# Altium PCB Audio_Meter_V4.5.PcbDoc (part 5 of 5)
Units mil, origin at the board's own origin, x right, y up, seen from the top; angles counter-clockwise.
Board outline 2756.14 x 2519.69 mil, 2 copper layers (Top Layer, Bottom Layer), stack 57.087 mil thick; 109 components, 62 nets, 315 pads, 566 vias.
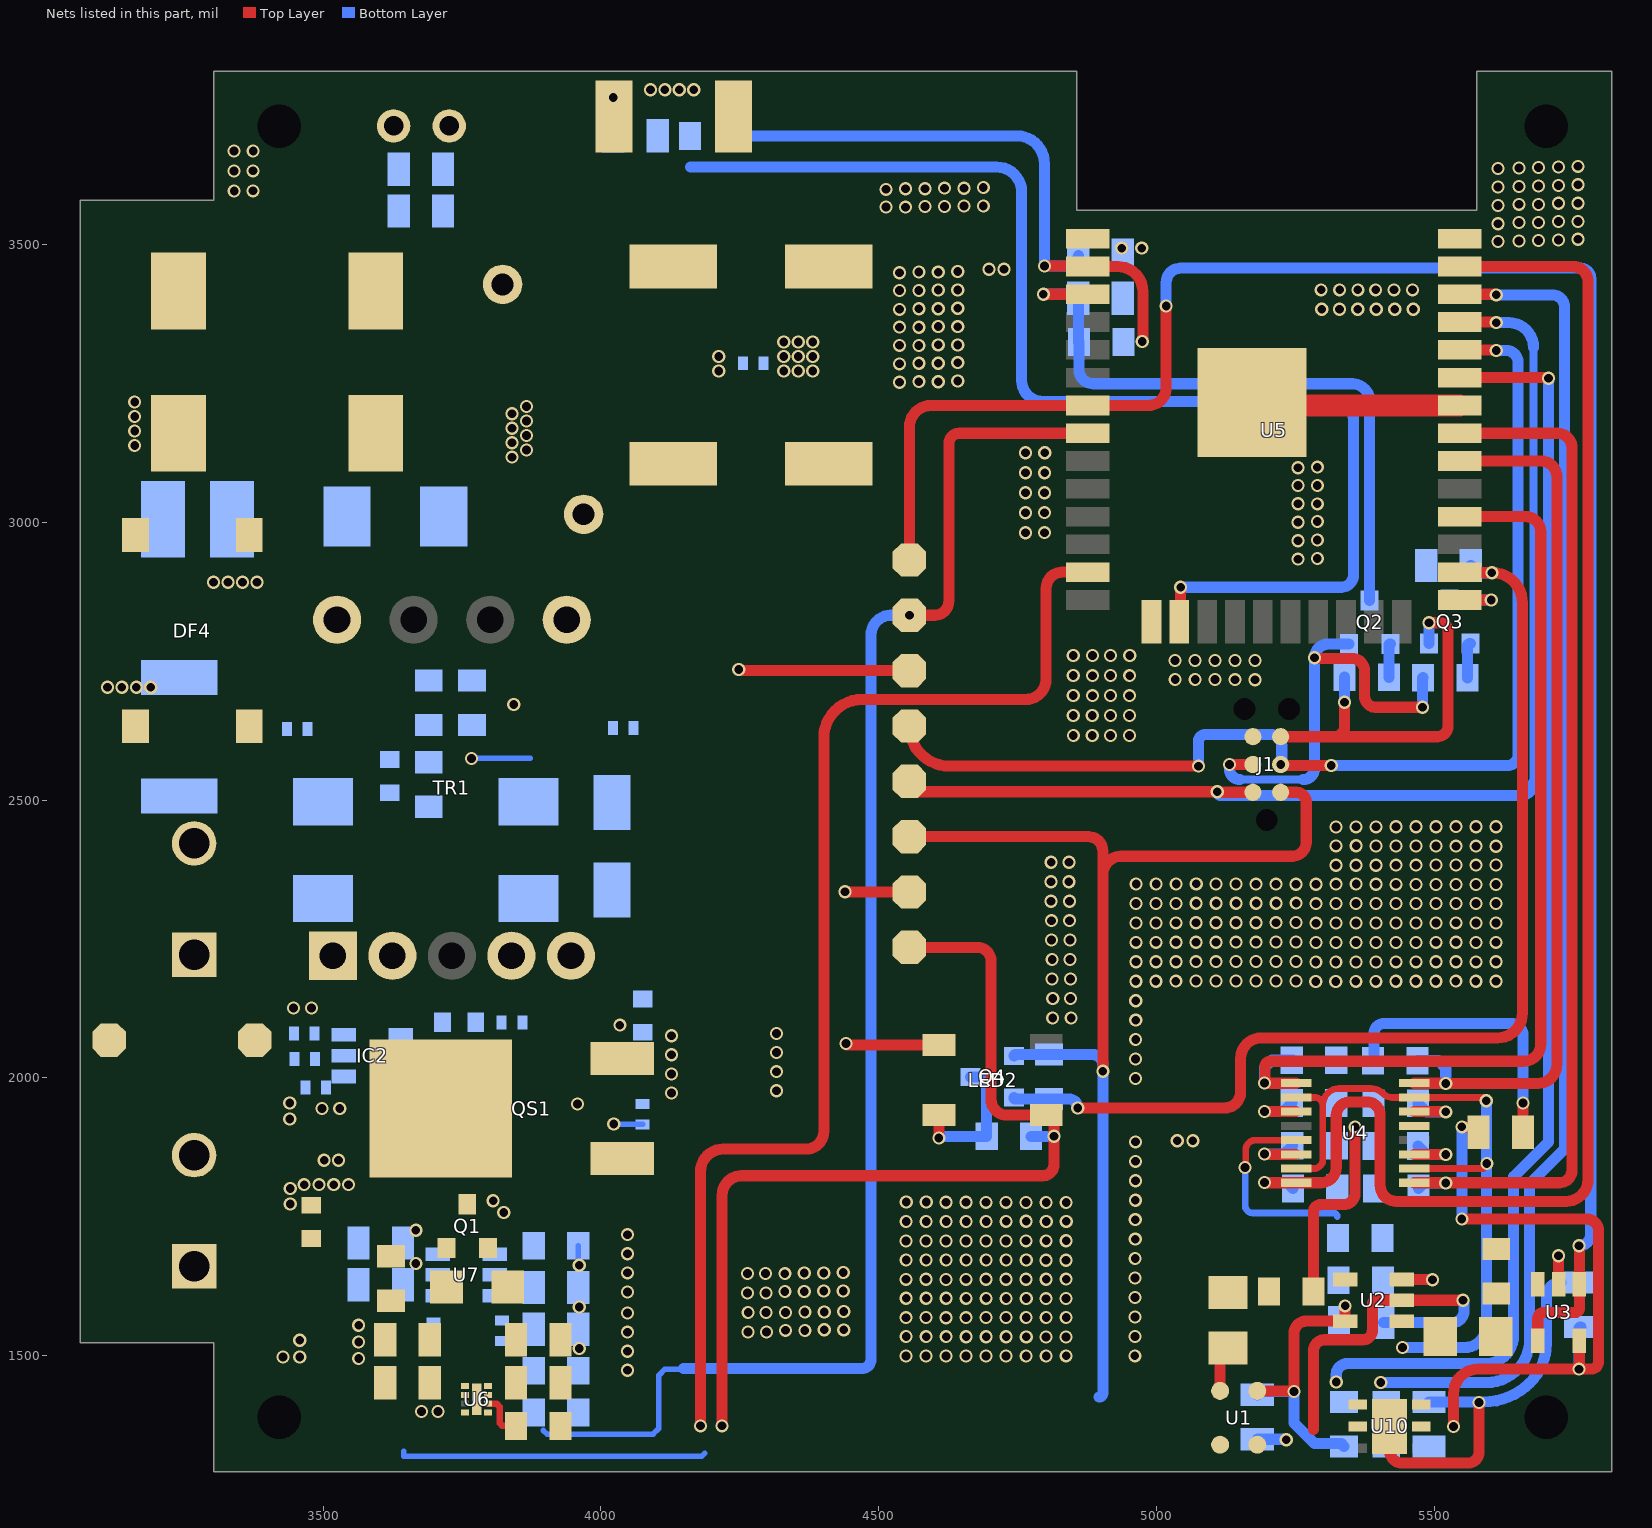
[diagram p2: the nets of this part, all layers, seen from the top]

## Via types
v1: diameter 23.62, hole 15.75, Top Layer to Bottom Layer, 566 vias

## Nets (pads, with @x,y where several pads share a name; then routed paths per layer and width w, separated by ;. In a path a pad name is that pad's centre, name@x,y a point inside that pad or via, vN(x,y) a via of type N, cw(c..) or ccw(c..) an arc to the next point about the centre after c; other vN are vias at no path point)
3V3: C1.1 C2.1 C3.1 C4.1 C7.1 C12.1 C13.1 C22.1 C76.2 J1.1 P4.1 Q4.1 R2.2 R4.2 R5.2 R24.2 R43.2 R56.1 RC1.2 U1.1 U2.5 U3.5 U4.13 U5.2 U6.1 U6.2 U6.4 U10.5 | length 4908
  Top Layer w20: P4.1@4555,2434.14 4876.86,2434.14 cw(c4876.86,2408) 4903,2408 4903,2366 ; v1(4798,3461) 4874.71,3461 cw(c4874.71,3460) U5.2@4875.71,3460 4930,3460 cw(c4930,3415) 4975,3415 4975,3326 cw(c4974,3326) v1(4974,3325) ; v1(4903,2012) 4903,2366 ; U1.1@5181,1437 5246,1437 v1(5247,1436) 5247,1540 cw(c5269.6,1540) 5269.6,1562.6 U2.5@5338.82,1562.6 5338.82,1590 v1(5339,1590) ; J1.1@5223,2514 5251,2514 cw(c5251,2496) 5269,2496 5269,2424 cw(c5244,2424) 5244,2399 4936,2399 ccw(c4936,2366) 4903,2366 ; v1(5534,1373) 5534,1432 cw(c5578,1432) 5578,1476 v1(5760,1476) ccw(c5760,1511) v1@5760.4,1476 ; v1(5549,1746) 5774,1746 cw(c5774,1725) 5795,1725 5795,1489.68 cw(c5781.56,1489.68) 5781.72,1476.25 v1@5760.4,1476 ; v1(5549,1912) 5569,1912 cw(c5569,1902) C2.1@5579,1902 ; U3.5@5760.4,1526.82 v1@5760.4,1476
  Bottom Layer w20: R24.2@4240,3695 4748.34,3695 cw(c4748.34,3645.34) 4798,3645.34 v1(4798,3461) 4840,3461 ccw(c4840,3480) C22.1@4859,3480 ; Q4.1@4743.37,2039.4 cw(c4745.97,2039.4) 4745.97,2042 R56.1@4806,2042 4885,2042 cw(c4885,2024) 4903,2024 v1(4903,2012) 4903,1433 cw(c4896,1433) 4896,1426 ; C1.1@5181,1430 5187,1436 v1(5247,1436) 5247,1379 5284,1342 5332,1342 R4.2@5337,1337 ; v1(5549,1746) v1(5549,1912) ; v1(5760,1476) 5760,1549 cw(c5763,1549) C3.1@5763,1552
  other v1: 3677,1400 3707,1400 4698,3455 4725,3455
#12-P: R8.2 U4.1 U5.28 | length 1773.1
  Top Layer w20: U4.1@5250.75,1990.57 5194.48,1990.57 5194.48,2020 cw(c5204.48,2020) 5204.48,2030 5660,2030 ccw(c5660,2061) 5691,2061 5691,2982.68 ccw(c5663.68,2982.68) 5663.68,3010 U5.28@5545,3010
  Bottom Layer w20: v1(5194.09,1990.95) 5194.09,2018.77 5207.09,2031.77 R8.2@5245.09,2031.77
#12-S: R7.1 U4.3 | length 111.5
  Top Layer w20: v1@5194.48,1939.39 U4.3@5250.75,1939.39
  Bottom Layer w20: v1(5194.09,1939.77) 5227.77,1939.77 R7.1@5243,1955
#13-P: R10.2 U4.16 U5.30 | length 1608.5
  Top Layer w20: U4.16@5463.35,1990.57 v1@5519.61,1990.57 ; v1(5520,1990.18) 5686,1990.18 ccw(c5686,2024.18) 5720,2024.18 5720,3081.51 ccw(c5691.51,3081.51) 5691.51,3110 U5.30@5545,3110
  Bottom Layer w20: R10.2@5469,2031 5507,2031 5520,2018 v1(5520,1990.18)
#13-S: R9.1 U4.14 | length 113.2
  Top Layer w20: U4.14@5463.35,1939.39 5519.61,1939.39 v1(5520,1939)
  Bottom Layer w20: R9.1@5470,1954.33 5485.33,1939 v1(5520,1939)
#14-P: R12.2 U4.9 U5.31 | length 1866.7
  Top Layer w20: U4.9@5463.35,1811.43 5724.81,1811.43 ccw(c5724.81,1833.62) 5747,1833.62 5747,3134 ccw(c5721,3134) 5721,3160 U5.31@5545,3160
  Bottom Layer w20: R12.2@5471,1801 5481.05,1811.05 v1(5520,1811.05)
#14-S: R11.1 U4.11 | length 112.7
  Top Layer w20: U4.11@5463.35,1862.61 v1@5519.61,1862.61
  Bottom Layer w20: R11.1@5470,1877.67 5485.44,1862.23 v1(5520,1862.23)
#15-P: R14.2 U4.8 U5.37 | length 2800.6
  Top Layer w20: v1@5194.48,1811.43 U4.8@5250.75,1811.43 5295.43,1811.43 ccw(c5295.43,1839) 5323,1839 5323,1932 cw(c5348,1932) 5348,1957 5378,1957 cw(c5378,1933) 5402,1933 5402,1807 ccw(c5431,1807) 5431,1778 5736.73,1778 ccw(c5736.73,1817.27) 5776,1817.27 5776,3432.68 ccw(c5748.68,3432.68) 5748.68,3460 U5.37@5545,3460
  Bottom Layer w20: v1(5194.09,1811.82) 5234.18,1811.82 R14.2@5245,1801
#15-S: R13.1 U4.6 | length 112.4
  Top Layer w20: v1@5194.48,1862.61 U4.6@5250.75,1862.61
  Bottom Layer w20: v1(5194.09,1863) 5229,1863 R13.1@5244,1878
#_OUT_MIC: R1.2 R7.2 R9.2 R11.2 R13.2 U2.4 | length 356.5
  Top Layer w20: R1.2@5282,1616 5282,1759 cw(c5295,1759) 5295,1772 5336.25,1772 ccw(c5336.25,1792.75) 5357,1792.75 v1(5357,1912)
#O_MIC: P9.1 U3.1 U3.4 U5.7 | length 3711.2
  Top Layer w20: P9.1@4555,2932 4555,3171 cw(c4594,3171) 4594,3210 U5.7@4875.71,3210 4985,3210 ccw(c4985,3242) 5017,3242 v1(5017,3389) ; U3.4@5685.6,1526.82 5685.6,1567.06 cw(c5696.53,1567.06) 5696.53,1578 5752,1578 ccw(c5752,1587) 5761,1587 5761,1629.18 U3.1@5760.4,1629.18 5760.4,1698 v1(5760,1698)
  Bottom Layer w20: v1(5017,3389) 5017,3431 cw(c5043,3431) 5043,3457 5762,3457 cw(c5762,3438) 5781,3438 5781,1719 cw(c5760,1719) v1(5760,1698)
#OUT_MIC: C9.1 U2.1 U4.2 U4.7 U4.10 U4.15 | length 1245.5
  Top Layer w12: U4.7@5250.75,1837.02 5283,1837 ccw(c5283,1853) 5299,1853 5299,1950 ; U4.2@5250.75,1964.98 5284.02,1964.98 cw(c5284.02,1950) 5299,1950 ; U4.10@5463.35,1837.02 5585.02,1837.02 ccw(c5585.02,1846) v1(5594,1846) ; v1(5593,1959) ccw(c5587.02,1959) 5587.02,1964.98 U4.15@5463.35,1964.98 5423.96,1964.98 cw(c5423.96,1988.96) 5407,1972 ccw(c5385.27,1950.27) 5385.27,1981 5328,1981 ccw(c5328,1952) 5299,1952 5299,1950
  Bottom Layer w20: v1(5442,1515) 5554,1515 ccw(c5554,1554) 5593,1554 v1(5593,1959)
AC1: DF4.4 J7.2 P19.1
AC2: J7.1 P20.1 RF12.2
AC_GND: C5.2 CF3.2 CF10.2 CF11.2 DF4.3 IC2.5 RF11.2 RF14.2 RF16.1 RF17.2 TR1.4
  other v1: 3440,1926 3440,1955 4127,1973 4316,1977 4127,2007.33 4316,2011.33 4127,2041.67 4316,2045.67 4127,2076 4316,2080 3447,2126 3479,2126
B_ADC: P8.1 R32.1 R33.1 U5.8 | length 2727.5
  Top Layer w20: v1(4555,2832.43) 4600.12,2832.43 ccw(c4600.12,2858.31) 4626,2858.31 4626,3141 cw(c4645,3141) 4645,3160 U5.8@4875.71,3160
  Bottom Layer w10: 3896,1366 3903,1359 4094,1359 4104,1369 4104,1465 4115,1476 4148,1476
  Bottom Layer w20: 4149,1477 4469,1477 ccw(c4469,1494) 4486,1494 4486,2797 cw(c4521.43,2797) 4521.43,2832.43 v1(4555,2832.43)
BATT_IN: C16.1 C17.1 C24.1 C26.1 J5.1 Q1.3 R32.2 U7.2
  other v1: 3825,1758 3806,1779
BR_: CF10.1 DF4.1 L1.1
  other v1: 3303,2892 3329,2892 3355,2892 3381,2892
CBC#: IC2.1 SBxx.1
CHG: RC1.1 U5.13 U7.3 | length 2696.9
  Top Layer w20: v1(4179,1374) 4179,1831 cw(c4220,1831) 4220,1872 4369,1872 ccw(c4369,1904) 4401,1904 4401,2612 cw(c4470,2612) 4470,2681 4764,2681 ccw(c4764,2718) 4801,2718 4801,2881 cw(c4830,2881) 4830,2910 U5.13@4875.71,2910
  Bottom Layer w10: 3645,1328 3645,1319 4181,1319 4187,1325
CS#: IC2.4 RF13.1
DRV#: IC2.3 RF10.2
DTR: J1.5 Q3.2 RC2.1 | length 680.8
  Top Layer w20: J1.5@5223,2614 5320,2614 ; v1(5338,2676) 5338,2632 cw(c5320,2632) 5320,2614 ; v1(5490,2819) 5509.76,2819 cw(c5509.76,2804.76) 5524,2804.76 5524,2633 cw(c5505,2633) 5505,2614 5320,2614
  Bottom Layer w20: v1(5338,2676) RC2.1@5338,2721 ; Q3.2@5489.6,2781.63 5489.6,2819 v1(5490,2819)
ENABLE: C78.1 Q2.3 R43.1 U5.3 | length 1189.4
  Top Layer w20: v1(4796,3410) U5.3@4875.71,3410
  Bottom Layer w20: v1(4796,3410) 4852,3410 cw(c4852,3403) C78.1@4859,3403 4859,3325 ccw(c4860,3325) R43.1@4860,3324 4860,3275 ccw(c4886,3275) 4886,3249 5352,3249 cw(c5352,3218) 5383,3218 Q2.3@5383,2859.37
GND: C1.2 C2.2 C3.2 C4.2 C5.1 C7.2 C10.2 C11.2 C12.2 C13.2 C16.2 C17.2 C18.2 C19.2 C22.2 C24.2 C25.2 C26.2 C78.2 CF4.2 CF7.2 J1.6 J5.2 J6.2 LED2.1 P5.1 R3.2 R8.1 R10.1 R12.1 R14.1 R26.1 R28.1 R29.1 R33.2 RF19.2 SW2.2 TR1.6 U1.2 U1.3 U2.2 U3.2 U4.5 U5.1 U5.15 U5.32 U5.38 U5.39 U6.5 U6.9 U7.5 U10.2 U10.7 | length 3133.6
  Top Layer w12: v1(5159,1839) ccw(c5159,1840) 5160,1840 5160,1870 cw(c5178.2,1870) 5178.2,1888.2 U4.5@5250.75,1888.2
  Top Layer w20: v1(4439,2335) 4439,2334.57 P5.1@4555,2334.57 ; v1(4441,2062) ccw(c4444,2062) 4444,2059 LED2.1@4608.16,2059 ; 5282,1368 5282,1508.71 cw(c5302.29,1508.71) 5302.29,1529 5371,1529 ccw(c5371,1546) 5388,1546 5388,1593 cw(c5394.61,1593) 5394.61,1599.61 ; 5394.61,1600 U2.2@5441.18,1600 v1(5551,1600) ; U10.7@5419.09,1330 ccw(c5442.09,1330) 5442.09,1307 5560,1307 ccw(c5560,1327) 5580,1327 v1(5580,1416) ; C2.2@5659,1902 v1(5659,1955) ; U3.2@5723,1629.18 v1(5723,1680)
  Top Layer w40: U5.39@5171.35,3215.31 ccw(c5176.67,3215.31) 5176.67,3210 U5.32@5545,3210
  Bottom Layer w10: R29.1@3959,1698 3959,1665 v1(3961,1663)
  Bottom Layer w12: v1(5159,1839) 5159,1771 ccw(c5173,1771) 5173,1757 5318,1757 cw(c5318,1750) 5325,1750
  Bottom Layer w20: C25.2@4022,3695 v1(4022,3764) ; C1.2@5181,1350 5232,1350 v1(5233,1349) ; R10.1@5389,2031 ccw(c5389,2033) 5391,2033 5391,2080 cw(c5409,2080) 5409,2098 5637.52,2098 cw(c5637.52,2076.52) 5659,2076.52 v1(5659,1955) ; C4.2@5408,1560 5532,1560 ccw(c5532,1581) 5553,1581 5553,1598 ccw(c5551,1598) v1(5551,1600) ; C7.2@5490,1417 v1@5580,1417 ; v1@5587.91,1417 ccw(c5587.91,1535.51) 5671.71,1451.71 ccw(c5601,1522.42) 5701,1522.42 5701,1606 cw(c5727,1606) 5727,1632 cw(c5727,1636) 5723,1636 v1(5723,1680)
  other v1: 4048,1474 3564,1495 4549.02,1499.67 4585.02,1499.79 4621.02,1499.56 4657.02,1499.67 4693.02,1499.79 4729.02,1499.79 4765.02,1499.9 4801.02,1499.9 4837.02,1500.01 4960.66,1500 4048,1508.33 3961,1513 3564,1525 4657.13,1534.45 4693.13,1534.45 4729.13,1534.34 4765.13,1534.23 4800.9,1533.89 4836.9,1534.01 4549.13,1534.67 4585.13,1534.56 4621.13,1534.56 4960.77,1535 4048,1542.67 4264.78,1543 4298,1543 4331.89,1545.89 4366.89,1545.78 4401.89,1546.89 4436.89,1546.78 3564,1555 4549.01,1568.67 4585.01,1568.78 4621.01,1568.56 4657.01,1568.67 4693.01,1568.78 4729.01,1568.78 4765.01,1568.89 4801.01,1568.89 4837.01,1569.01 4960.89,1570 4048,1577 4264.89,1578 4296.89,1578 4331.89,1577.89 4366.89,1579 4401.89,1578.89 4436.89,1580 3961,1588 4657.12,1603.45 4693.12,1603.45 4729.12,1603.34 4765.12,1603.23 4800.89,1602.89 4836.89,1603 4549.12,1603.67 4585.12,1603.56 4621.12,1603.56 4961,1605 4263.78,1613 4297,1613 4048,1615 4330.89,1615.89 4365.89,1615.78 4400.89,1616.89 4435.89,1616.78 4549.01,1637.67 4585.01,1637.78 4621.01,1637.56 4657.01,1637.67 4693.01,1637.78 4729.01,1637.78 4765.01,1637.89 4801.01,1637.89 4837.01,1638 4961.11,1640 4263.89,1648 4295.89,1648 4330.89,1647.89 4048,1649.33 4365.89,1649 4400.89,1648.89 4435.89,1650 4657.12,1672.45 4693.12,1672.45 4729.12,1672.33 4765.12,1672.22 4800.89,1671.89 4836.89,1672 4549.12,1672.67 4585.12,1672.56 4621.12,1672.56 4961.22,1675 4048,1683.67 4549,1706.67 4585,1706.78 4621,1706.55 4657,1706.67 4693,1706.78 4729,1706.78 4765,1706.89 4801,1706.89 4837,1707 4961.33,1710 4048,1718 4549.11,1741.67 4585.11,1741.78 4621.11,1741.78 4657.11,1741.89 4693.11,1741.89 4729.11,1742 4765.11,1742.11 4801.11,1741.89 4837.11,1742 4961.44,1745 4620.99,1776.44 4656.99,1776.33 4692.99,1776.22 4728.99,1776.22 4764.99,1776.11 4800.99,1776.11 4836.99,1776 4549.22,1776.67 4585.22,1776.78 4961.55,1780 4961.67,1815 4961.78,1850 4961.89,1885 5037,1887 5065,1887 4961.89,1999 4962,2034 4962.11,2069 4962.22,2104 4812.78,2108 4846,2108 4962.33,2139 4812.89,2143 4844.89,2143 4962.44,2174 4998.44,2174 5034.44,2174.11 5070.44,2174.22 5106.44,2174.22 5142.44,2174.33 5178.44,2174.33 5214.44,2174.45 5286.22,2173.55 5322.22,2173.67 5358.22,2173.78 5394.22,2173.78 5430.22,2173.89 5466.22,2173.89 5502.22,2174 5538.22,2174.11 5574.22,2173.89 5610.22,2174 5250.44,2174.56 4811.78,2178 4845,2178 4962.55,2209 4998.55,2209 5034.55,2209.11 5070.55,2209.22 5106.55,2209.22 5142.55,2209.33 5178.55,2209.33 5214.55,2209.45 5286.33,2208.55 5322.33,2208.67 5358.33,2208.78 5394.33,2208.78 5430.33,2208.89 5466.33,2208.89 5502.33,2209 5538.33,2209.11 5574.33,2208.89 5610.33,2209 5250.55,2209.56 4811.89,2213 4843.89,2213 4962.67,2244 4998.67,2244 5034.67,2244.11 5070.67,2244.22 5106.67,2244.22 5142.67,2244.33 5178.67,2244.33 5214.67,2244.45 5286.44,2243.55 5322.44,2243.67 5358.44,2243.78 5394.44,2243.78 5430.44,2243.89 5466.44,2243.89 5502.44,2244 5538.44,2244.11 5574.44,2243.89 5610.44,2244 5250.67,2244.56 4810.78,2248 4844,2248 4962.78,2279 4998.78,2279 5034.78,2279.11 5070.78,2279.22 5106.78,2279.22 5142.78,2279.33 5178.78,2279.33 5214.78,2279.45 5286.55,2278.55 5322.55,2278.67 5358.55,2278.78 5394.55,2278.78 5430.55,2278.89 5466.55,2278.89 5502.55,2279 5538.55,2279.11 5574.55,2278.89 5610.55,2279 5250.78,2279.56 4810.89,2283 4842.89,2283 4962.89,2314 4998.89,2314 5034.89,2314.11 5070.89,2314.22 5106.89,2314.22 5142.89,2314.33 5178.89,2314.33 5214.89,2314.45 5286.66,2313.55 5322.66,2313.67 5358.66,2313.78 5394.66,2313.78 5430.66,2313.89 5466.66,2313.89 5502.66,2314 5538.66,2314.11 5574.66,2313.89 5610.66,2314 5250.89,2314.56 4809.78,2318 4843,2318 5394.54,2348.44 5430.54,2348.33 5466.54,2348.22 5502.54,2348.22 5538.54,2348.11 5574.54,2348.11 5610.54,2348 4963,2349 4999,2349 5035,2349.11 5071,2349.22 5106.77,2348.89 5142.77,2348.78 5178.77,2348.67 5214.77,2348.67 5250.77,2348.55 5286.77,2348.55 5322.77,2348.67 5358.77,2348.78 4809.89,2353 4841.89,2353 5322.66,2382.66 5358.66,2382.77 5394.66,2382.77 5430.66,2382.89 5466.66,2382.89 5502.66,2383 5538.66,2383.11 5574.66,2382.89 5610.66,2383 4810,2388 4842,2388 5394.54,2417.44 5430.54,2417.33 5466.54,2417.22 5502.54,2417.22 5538.54,2417.11 5574.54,2417.11 5610.54,2416.99 5322.77,2417.66 5358.77,2417.77 5322.65,2451.66 5358.65,2451.77 5394.65,2451.77 5430.65,2451.88 5466.65,2451.88 5502.65,2451.99 5538.65,2452.11 5574.65,2451.88 5610.65,2451.99 4850,2616 4884,2616.12 4917,2616 4951,2616.12 4849.89,2652 4883.89,2652.12 4916.89,2652 4950.89,2652.12 4849.89,2688 4884.22,2687.89 4916.89,2688 4951.22,2687.89 5033.12,2717 5069.12,2717.11 5104.89,2716.78 5140.89,2716.67 5176.89,2716.56 4849.78,2724 4884.33,2723.89 4916.78,2724 4951.33,2723.89 5033,2751 5069,2751.11 5105,2751.11 5141,2751.22 5177,2751.22 4849.78,2760 4884.44,2759.89 4916.78,2760 4951.44,2759.89 5254,2933.44 5289,2934.55 5254,2966.67 5289,2967.78 4764,2981 4798,2981.12 5254,2999.89 5289,3001 4763.89,3017 4797.89,3017.12 5254,3033.11 5289,3033 4763.89,3053 4798.22,3052.89 5254,3065.89 5289,3065.78 4763.78,3089 4798.33,3088.89 5254,3097.89 5289,3099 4763.78,3125 4798.44,3124.89 4537,3251.67 4572,3252.78 4607,3252.67 4642,3253.78 4329,3272 4355,3272 4381,3272 4537,3284.89 4572,3286 4607,3285.89 4642,3287 4329,3298 4355,3298 4381,3298 4537,3318.11 4572,3318 4607,3319.11 4642,3319 4329,3324 4355,3324 4381,3324 4537,3350.89 4572,3350.78 4607,3351.89 4642,3351.78 4537,3382.89 5297,3383 5329,3383 5361.78,3383 5395,3383 5428.22,3383 5461.45,3383 4572,3384 4607,3383.89 4642,3385 4537,3416.89 4572,3416.78 4607,3417.89 4642,3417.78 5295.89,3418 5329.11,3418 5361.89,3418 5393.89,3418 5427.11,3418 5460.33,3418 4537,3448.89 4572,3450 4607,3449.89 4642,3451 4937,3493 4973,3493 5614,3505 5652,3505.89 5687,3507 5723,3507.89 5758,3509 5614,3537 5652,3539.11 5687,3539 5723,3541.11 5758,3541 4513,3566.89 4548,3566.78 4583,3567.89 4618,3567.78 4653,3568.89 4688,3568.78 5614,3569.78 5652,3571.89 5687,3571.78 5723,3573.89 5758,3573.78 3340,3596 3374,3596.12 4513,3598.89 4548,3600 4583,3599.89 4618,3601 4653,3600.89 4688,3602 5614,3603 5652,3603.89 5687,3605 5723,3605.89 5758,3607 3339.89,3632 3373.89,3632.12 5614,3636.22 5652,3637.11 5687,3638.22 5723,3639.11 5758,3640.22 3339.89,3668 3374.22,3667.89
IND#: CF1.1 CF11.1 D1.1 L1.2 RF7.2 TR1.1
  other v1: 3161,3138 3161,3164 3161,3190 3161,3216
IO_0: Q3.3 U5.25 | length 132.4
  Top Layer w20: U5.25@5545,2860 v1(5602,2860)
  Bottom Layer w20: Q3.3@5527,2860.37 5527,2860 v1(5602,2860)
IO_4: LED2.2 Q4.3 R57.2 | length 261.4
  Top Layer w20: v1(4608,1892) 4608.16,1892 LED2.2@4608.16,1933.02
  Bottom Layer w20: v1(4608,1892) cw(c4611,1892) 4611,1895 R57.2@4694,1895 4694,1993 ccw(c4685,1993) 4685,2002 Q4.3@4664.63,2002
IO_4#: C76.1 Q4.2 R56.2 U5.26 | length 1976.4
  Top Layer w20: v1(4858,1946) 5122,1946 ccw(c5122,1975) 5151,1975 5151,2035 cw(c5188,2035) 5188,2072 5613,2072 ccw(c5613,2117) 5658,2117 5658,2855 ccw(c5604,2855) 5604,2909 v1(5603,2909) 5546,2909 cw(c5546,2910) U5.26@5545,2910
  Bottom Layer w20: Q4.2@4743.37,1964.6 ccw(c4745.97,1964.6) 4745.97,1962 R56.2@4806,1962 4842,1962 cw(c4842,1946) v1(4858,1946) ; C76.1@5565,2922 ccw(c5578,2922) 5578,2909 v1(5603,2909)
ISET: R28.2 U7.4
NetC8_2: C8.2 R1.1
NetC9_2: C9.2 R6.2
NetCF1_2: CF1.2 D1.2 RF8.1
NetD2_2: D2.2 RF8.2 | length 106
  Bottom Layer w10: v1(3767,2575) 3873,2575
  other v1: 3843,2672
NetD3_2: D3.2 RF18.2
NetDF4_2: DF4.2 RF12.1
  other v1: 3112,2703 3138,2703 3164,2703 3190,2703
NetQ2_1: Q2.1 RC2.2 | length 61
  Bottom Layer w20: RC2.2@5418,2721 5418,2778.23 cw(c5420.4,2778.23) Q2.1@5420.4,2780.63
NetQ3_1: Q3.1 RC3.2 | length 64.7
  Bottom Layer w20: RC3.2@5559,2720 5559,2776.23 cw(c5564.4,2776.23) Q3.1@5564.4,2781.63
NetQS1_1: QS1.1 RF10.1 RF11.1 | length 52.2
  Bottom Layer w10: v1(4023,1917) 4023.5,1916.5 RF11.1@4075,1916.5
NetQS1_3: QS1.3 RF13.2 RF14.1 | length 5.4
  Bottom Layer w10: v1(3958,1953) 3962,1953 v1@3963,1952
  other v1: 4034,2095
NetR2_1: R2.1 R3.1 U2.3 | length 55.2
  Top Layer w20: U2.3@5441.18,1637.4 5495,1637.4 5495,1637 v1(5496,1637)
NetR6_1: R6.1 U3.3
NetR39_1: R39.1 U6.6 | length 83.6
  Top Layer w12: U6.6@3797,1414 3812,1414 3818,1408 3818,1379 3823,1374 R39.1@3847,1374
NetRF2_2: RF2.2 RF6.2
NetRF6_1: RF6.1 RF7.1
NetRF17_1: RF17.1 SBxx.2
OUT_MIC: C8.1 U1.4 | length 85
  Top Layer w20: U1.4@5114.07,1437 5114.07,1500.07 cw(c5128,1500.07) C8.1@5128,1514
RTS: J1.4 Q2.2 RC3.1 | length 817.5
  Top Layer w20: v1(5131,2564) J1.4@5173,2564 ; v1(5284,2756) ccw(c5285,2756) 5285,2755 5351,2755 cw(c5351,2732) 5374,2732 5374,2687 ccw(c5394,2687) 5394,2667 v1(5478,2667)
  Bottom Layer w15: 5149.75,2537 5263.51,2537
  Bottom Layer w20: v1(5131,2564) 5131,2555.75 ccw(c5149.75,2555.75) 5149.75,2537 ; 5263.51,2537 ccw(c5263.51,2557.49) 5284,2557.49 v1(5284,2756) cw(c5308.63,2756) 5308.63,2780.63 Q2.2@5345.6,2780.63 ; v1(5478,2667) 5478,2719 cw(c5479,2719) RC3.1@5479,2720
RX: J1.3 P7.1 U5.34 | length 2071
  Top Layer w20: P7.1@4555,2633.29 ccw(c4627.29,2633.29) 4627.29,2561 v1(5075,2561) ; v1(5223,2564) ccw(c5225,2564) 5225,2562 v1(5314,2562) ; U5.34@5545,3310 v1@5610,3310
  Bottom Layer w20: v1(5075,2561) 5075,2605 cw(c5088,2605) 5088,2618 5205,2618 cw(c5205,2598) 5225,2598 5225,2566 cw(c5223,2566) v1(5223,2564) ; v1(5314,2562) 5631,2562 ccw(c5631,2581) 5650,2581 5650,3287.52 ccw(c5628.52,3287.52) 5628.52,3309 v1(5611,3309)
SCL_: R5.1 U5.36 U10.6 | length 2396.2
  Top Layer w20: U5.36@5545,3410 v1@5610,3410
  Bottom Layer w20: v1(5403,1452) 5593.6,1452 ccw(c5593.6,1529.4) 5671,1529.4 5671,1809 5734,1872 5734,3241 5734,3386.34 ccw(c5711.34,3386.34) 5711.34,3409 v1(5611,3409)
SDA_: R4.1 U5.33 U10.1 | length 2281.4
  Top Layer w20: U5.33@5545,3260 5704,3260 cw(c5704,3259) v1(5705,3259)
  Bottom Layer w20: v1(5323,1453) 5323,1466 cw(c5343,1466) 5343,1486 5591.56,1486 ccw(c5591.56,1536.44) 5642,1536.44 5642,1822.18 5705,1885.18 5705,3235.17 v1(5705,3259)
SOFT_P: C25.1 R24.1 SW2.1 U5.16 | length 2264.8
  Top Layer w20: U5.16@5040.67,2820.63 ccw(c5040.67,2822.96) 5043,2822.96 v1(5043,2883)
  Bottom Layer w20: 4161,3639 4712,3639 cw(c4712,3594) 4757,3594 4757,3255 ccw(c4795,3255) 4795,3217 5321.83,3217 cw(c5321.83,3184.83) 5354,3184.83 5354,2905 cw(c5332,2905) 5332,2883 v1(5043,2883)
  other v1: 4089,3778 4115,3778 4141,3778 4167,3778
TR_2: D2.1 QS1.2 TR1.2
TR_5: D3.1 RF15.1 TR1.5
TR_9: DF1.1 TR1.9
TS: R29.2 U7.1
TX: J1.2 P6.1 U5.35 | length 2155.9
  Top Layer w20: P6.1@4555,2533.71 ccw(c4573.71,2533.71) 4573.71,2515 v1(5109,2515) ccw(c5110,2515) 5110,2514 J1.2@5173,2514 ; U5.35@5545,3360 v1@5610,3360
  Bottom Layer w15: 5678,2531.83 5678,3314.51
  Bottom Layer w20: v1(5109,2515) ccw(c5116,2515) 5116,2508 5654.17,2508 ccw(c5654.17,2531.83) 5678,2531.83 ; v1(5611,3359) 5633.51,3359 cw(c5633.51,3314.51) 5678,3314.51
VBUS: C18.1 C19.1 D4.A LED2.3 P2.1 Q1.1 R26.2 R57.1 SB1.1 U7.6 | length 1706.5
  Top Layer w20: v1(4218,1374) 4218,1789 cw(c4253,1789) 4253,1824 4795,1824 ccw(c4795,1844) 4815,1844 v1(4815,1895) 4815,1919.09 ccw(c4801.07,1919.09) LED2.3@4801.07,1933.02 4730.46,1933.02 cw(c4730.46,1961.48) 4702,1961.48 4702,2210 ccw(c4677,2210) 4677,2235 P2.1@4555,2235
  Bottom Layer w20: R57.1@4774,1895 v1(4815,1895)
  other v1: 3428,1498 3458,1498 3458,1528 3667,1666 3667,1726
VDD#: CF3.1 IC2.2 RF2.1 RF18.1
  other v1: 3502,1852 3528,1852 3498,1945 3530,1945
VIN: C10.1 C11.1 D4.K Q1.2 R39.2 U6.7 U6.8
VOUT: CF4.1 CF7.1 DF1.2 J6.1 P18.1 RF19.1 SB1.2 | length 312.9
  Top Layer w20: v1(4248,2735) 4248,2736 ccw(c4251.14,2736) 4251.14,2732.86 P18.1@4555,2732.86
  Bottom Layer w20: v1(4248,2735) ccw(c4250,2735) v1@4250,2733
  other v1: 3441,1773 3441,1801 3466,1808 3492.67,1808 3519.33,1808 3546,1808 3840,3117 3866,3130 3840,3143 3866,3156 3840,3169 3866,3182 3840,3195 3866,3208 4212,3272 4212,3298
VS#: IC2.6 RF15.2 RF16.2
pads on no net: J1.MP5 J1.MP6 J1.MP7 LED2.4 TR1.3 TR1.7 TR1.8 U4.4 U4.12 U5.4 U5.5 U5.6 U5.9 U5.10 U5.11 U5.12 U5.14 U5.17 U5.18 U5.19 U5.20 U5.21 U5.22 U5.23 U5.24 U5.27 U5.29 U6.3 U10.3 U10.4

## Polygon pours and split planes (outlines as drawn)
GND on Bottom Layer "Bottom Layer-GND" (hatched 45Degree grid 20 track 8, pour order 0): 3118,1555 3118,3533 3337,3533 3337,3741 4702,3741 4702,3495 5683,3495 5683,3741 5773,3741 5773,1373 3337,1373 3337,1555
GND on Top Layer "Bottom Layer-GND" (hatched 45Degree grid 20 track 8, remove dead copper, pour order 2): 3118,1555 3118,3533 3337,3533 3337,3741 4702,3741 4702,3495 5595,3495 5595,3741 5773,3741 5773,1373 3337,1373 3337,1555

## Other copper
Top Layer:
  rectangle net GND: 5260,1329 5334,1389
  rectangle net GND: 5017,1820 5175,1902
  rectangle net GND: 5017,1333 5065,1899
  rectangle net 3V3: 4947,3310 4987,3474
  rectangle net 3V3: 4681,3437 4987,3474
  rectangle net 3V3: 4883,1996 4922,2444
  rectangle net GND: 5219,1319 5295,1396
  rectangle net GND: 4973,2595 5195,2634
  rectangle net GND: 4971,2907 5248,3182
  rectangle net GND: 4979,2595 5008,3182
  rectangle net GND: 5074,3310 5270,3530
  rectangle net GND: 4401,3490 5584,3533
  rectangle net #_OUT_MIC: 5258,1584 5307,1652
  rectangle net VOUT: 3409,1752 3557,1820
  rectangle net NetR6_1: 5576,1649 5698,1717
  rectangle net NetC9_2: 5575,1493 5648,1641
  rectangle net #OUT_MIC: 5417,1495 5544,1578
  rectangle net OUT_MIC: 5084,1412 5155,1545
  rectangle net NetC8_2: 5086,1581 5250,1651
  rectangle net #_OUT_MIC: 5258,1623 5369,1652
  rectangle net 3V3: 5435,1904 5579,1920
  rectangle net GND: 4032,1297 5334,1350
  rectangle net GND: 5282,1353 5414,1388
  rectangle net 3V3: 5459,1358 5548,1388
  rectangle net SCL_: 5458,1400 5496,1467
  rectangle net SCL_: 5386,1430 5493,1467
  rectangle net SDA_: 5303,1397 5379,1467
  rectangle net AC2: 3226,2073 3318,2263
  rectangle net AC2: 3092,2043 3318,2091
  rectangle net AC1: 3351,2055 3400,2418
  rectangle net GND: 3202,1528 3357,1606
  rectangle net GND: 3070,1528 3218,1778
  rectangle net GND: 3376,1437 3495,1472
  rectangle net GND: 3358,1437 3386,1776
  rectangle net GND: 3350,1296 3501,1343
  rectangle net GND: 3320,1296 3368,1793
  rectangle net VBUS: 3395,1482 3471,1656
  rectangle net GND: 3070,1718 3386,1921
  rectangle net AC_GND: 4111,1951 4347,2095
  rectangle net AC_GND: 3429,1899 3470,2153
  rectangle net VDD#: 3479,1834 3561,1960
  rectangle net NetDF4_2: 3074,2678 3293,2733
  rectangle net GND: 3834,3623 4057,3798
  rectangle net GND: 3619,3575 4498,3647
  rectangle net GND: 3469,3577 3668,3801
  rectangle net SOFT_P: 4072,3662 4278,3797
  rectangle net GND: 3871,2776 4498,3051
  rectangle net GND: 4299,2931 4498,3585
  rectangle net VOUT: 3756,3064 4061,3236
  rectangle net VOUT: 3950,3064 4285,3565
  rectangle net AC_GND: 3068,2995 3120,3331
  rectangle net AC_GND: 3068,2870 3273,3061
  rectangle net IND#: 3129,3073 3331,3235
  rectangle net BR_: 3353,2993 3703,3234
  rectangle net BR_: 3341,3034 3422,3234
  rectangle net BR_: 3283,2871 3422,3063
  rectangle net NetD2_2: 3814,2600 3858,2689
  rectangle net NetD2_2: 3753,2559 3858,2602
  rectangle net AC_GND: 3068,3251 3930,3566
  rectangle net AC1: 3183,2373 3430,2512
  rectangle net AC1: 3067,2373 3224,2667
  rectangle net NetDF4_2: 3239,2526 3432,2734
  rectangle net NetQS1_3: 3945,1968 3989,1999
  rectangle net NetQS1_3: 3945,1939 3971,1999
  rectangle net NetQS1_1: 3978,1809 4102,1939
  rectangle net NetQS1_3: 3977,1968 4103,2105
  rectangle net TR_2: 3646,1808 3918,2104
  rectangle net TR_2: 3571,1805 3679,2281
  rectangle net GND: 3478,1296 5277,1327
  region net GND: 4018,1311 4018,1424 3992,1424 3992,1311
  rectangle net GND: 3964,1411 4018,1439
  rectangle net VIN: 3884,1335 3985,1402
  rectangle net VIN: 3877,1335 3887,1433
  rectangle net BATT_IN: 3739,1742 3841,1795
  rectangle net GND: 3647,1359 3781,1376
  rectangle net GND: 3770,1361 3803,1401
  rectangle net GND: 3635,1319 3803,1368
  rectangle net GND: 3894,1411 4084,1796
  rectangle net VIN: 3792,1427 3887,1489
  rectangle net GND: 3478,1323 3652,1624
  rectangle net VBUS: 3395,1632 3730,1743
  rectangle net VBUS: 3659,1584 3760,1734
  rectangle net 3V3: 3730,1384 3760,1401
  rectangle net 3V3: 3660,1384 3737,1434
  rectangle net 3V3: 3660,1429 3760,1574
  rectangle net VIN: 3767,1484 3887,1734
Bottom Layer:
  rectangle net GND: 5048,2084 5669,2121
  rectangle net GND: 5017,1872 5080,2121
  rectangle net 3V3: 4682,2036 4922,2084
  rectangle net 3V3: 4681,2036 4719,3474
  rectangle net 3V3: 4884,1449 4922,2071
  rectangle net VBUS: 4201,1307 4233,1386
  rectangle net CHG: 4167,1314 4192,1387
  rectangle net 3V3: 4122,1346 4160,1456
  rectangle net 3V3: 4122,1396 5263,1456
  rectangle net GND: 5691,1612 5753,1652
  rectangle net 3V3: 5458,2886 5534,3322
  rectangle net 3V3: 5515,2971 5582,3355
  rectangle net 3V3: 4899,3293 5582,3355
  rectangle net GND: 4898,3367 4996,3515
  rectangle net GND: 5298,1680 5370,1812
  rectangle net NetR2_1: 5435,1607 5515,1665
  rectangle net NetR2_1: 5378,1607 5444,1747
  rectangle net 3V3: 5299,1526 5370,1673
  rectangle net GND: 5296,1999 5415,2067
  rectangle net GND: 5298,1757 5417,1836
  rectangle net #_OUT_MIC: 5297,1845 5417,1991
  rectangle net 3V3: 5301,1298 5549,1388
  rectangle net SCL_: 5381,1396 5450,1468
  rectangle net SDA_: 5303,1396 5371,1468
  rectangle net GND: 4070,1688 4449,1735
  rectangle net GND: 4036,1371 4083,1735
  rectangle net GND: 4416,1688 4464,3257
  rectangle net VBUS: 3607,1294 4233,1307
  rectangle net VBUS: 3607,1298 3627,1474
  rectangle net VBUS: 3503,1436 3626,1474
  rectangle net 3V3: 3840,1331 4160,1347
  rectangle net VBUS: 3503,1436 3530,1552
  rectangle net VBUS: 3395,1482 3530,1552
  rectangle net VOUT: 3437,1746 3680,1832
  rectangle net VOUT: 3068,1559 3530,1771
  rectangle net TR_5: 4111,1878 4181,1935
  rectangle net TR_5: 3460,1876 3970,1905
  rectangle net VOUT: 3437,1803 4244,1833
  rectangle net BATT_IN: 4355,1742 4408,3229
  rectangle net BATT_IN: 4070,3192 4408,3230
  rectangle net BATT_IN: 4070,3192 4127,3562
  rectangle net BATT_IN: 3692,3521 4127,3563
  rectangle net AC_GND: 4283,1803 4348,3181
  rectangle net AC_GND: 3949,3064 4348,3181
  rectangle net VOUT: 4231,1803 4274,2965
  region net AC_GND: 4004,3066 4004,3272 3929,3272 3929,3066
  rectangle net AC_GND: 3861,3246 4004,3479
  rectangle net AC_GND: 3627,3246 3920,3479
  rectangle net VOUT: 3832,2893 4274,2968
  region net GND: 4464,3370 4279.65,3370 4279.65,3243 4464,3243
  rectangle net VOUT: 4139,3243 4270,3370
  rectangle net AC_GND: 3394,2109 3585,2154
  rectangle net AC_GND: 3432,1900 3451,2048
  rectangle net TR_5: 3394,2061 3463,2102
  rectangle net TR_5: 3394,1871 3421,2080
  region net NetQS1_3: 3460,1926 3460,1912 3969,1912 3969,1926
  rectangle net VDD#: 3570,1955 3609,2017
  rectangle net AC_GND: 3515,2026 3582,2052
  rectangle net AC_GND: 3571,2026 3582,2071
  rectangle net AC_GND: 3571,2064 3608,2150
  rectangle net VDD#: 3477,1840 4210,1864
  rectangle net VDD#: 3482,1934 3609,1957
  rectangle net VDD#: 3589,1934 3609,2055
  rectangle net VDD#: 3599,2026 3673,2055
  rectangle net VDD#: 4191,1840 4218,2477
  rectangle net VDD#: 4151,2446 4218,2711
  region net VDD#: 3985,2711 3985,2662 4179,2662 4179,2711
  rectangle net VDD#: 3985,2610 4034,2699
  rectangle net IND#: 3322,2418 3381,2782
  rectangle net IND#: 3069,2766 3426,2845
  rectangle net NetDF4_2: 3073,2575 3280,2734
  rectangle net SOFT_P: 4071,3629 4193,3798
  rectangle net VOUT: 3624,2916 3913,3234
  rectangle net IND#: 3070,2759 3267,3233
  rectangle net BR_: 3283,2870 3423,3183
  rectangle net TR_9: 3441,2664 3588,3183
  rectangle net NetD2_2: 3617,2644 3647,2769
  rectangle net NetD2_2: 3617,2754 3862,2769
  rectangle net NetD2_2: 3813,2661 3864,2764
  rectangle net NetD2_2: 3461,2604 3647,2651
  rectangle net NetD2_2: 3739,2541 3836,2602
  rectangle net VDD#: 3746,2609 4034,2653
  rectangle net AC_GND: 3571,2137 3805,2154
  rectangle net TR_5: 3413,1871 4183,1893
  rectangle net TR_5: 4156,1871 4183,2181
  region net GND: 3665,3801 3469,3801 3469,3521 3665,3521
  rectangle net BATT_IN: 3690,3521 3885,3801
  rectangle net AC2: 3072,2162 3309,2289
  rectangle net AC2: 3071,2163 3218,2540
  rectangle net TR_2: 3817,2291 3925,2411
  rectangle net NetD3_2: 3965,2423 4050,2597
  rectangle net NetD3_2: 4041,2423 4144,2653
  rectangle net TR_5: 3938,2262 4183,2410
  rectangle net TR_5: 3902,2165 4183,2268
  rectangle net NetQS1_3: 3741,1922 3970,1969
  rectangle net NetQS1_3: 3460,1920 3474,1995
  rectangle net VDD#: 3740,2010 3747,2026
  rectangle net NetQS1_1: 3977,1900 4002,2002
  rectangle net NetQS1_1: 3741,1978 4002,2002
  rectangle net AC_GND: 3791,2137 3890,2269
  rectangle net AC_GND: 4010,1943 4144,1977
  region net AC_GND: 4144,1942 4144,2155 4110,2155 4110,1942
  rectangle net AC_GND: 3875,2123 4144,2157
  rectangle net NetQS1_3: 4010,2080 4102,2114
  rectangle net NetQS1_1: 3978,1900 4102,1934
  rectangle net DRV#: 3616,1934 3733,2016
  rectangle net AC_GND: 3848,2066 3890,2151
  rectangle net AC_GND: 3755,2010 3890,2072
  rectangle net NetRF17_1: 3755,2079 3841,2126
  rectangle net CBC#: 3675,2079 3748,2126
  rectangle net CBC#: 3617,2064 3687,2126
  rectangle net VDD#: 3694,2048 3747,2072
  rectangle net VDD#: 3616,2023 3747,2057
  rectangle net NetD2_2: 3817,2424 3951,2602
  rectangle net NetCF1_2: 3392,2586 3452,2651
  rectangle net NetRF2_2: 3654,2682 3805,2747
  rectangle net NetRF6_1: 3662,2541 3729,2675
  rectangle net NetCF1_2: 3557,2542 3655,2590
  rectangle net NetCF1_2: 3392,2443 3566,2590
  rectangle net IND#: 3576,2398 3799,2534
  rectangle net IND#: 3546,2377 3798,2433
  rectangle net IND#: 3323,2165 3565,2434
  rectangle net TR_2: 3572,2164 3677,2367
  rectangle net TR_2: 3572,2278 3925,2367
  rectangle net CS#: 3512,1985 3563,2018
  rectangle net CS#: 3490,1967 3563,1999
  rectangle net VS#: 3472,2006 3505,2102
  rectangle net VS#: 3472,2062 3564,2102
  rectangle net CHG: 3634,1314 3653,1475
  rectangle net CHG: 3634,1458 3777,1475
  rectangle net CHG: 3761,1458 3777,1556
  rectangle net CHG: 3761,1545 3799,1624
  rectangle net GND: 3537,1482 3754,1538
  rectangle net VBUS: 3688,1731 3726,1795
  rectangle net BATT_IN: 3920,1372 4027,1424
  rectangle net BATT_IN: 3994,1372 4027,1795
  rectangle net BATT_IN: 3786,1633 3889,1659
  rectangle net BATT_IN: 3761,1742 4404,1795
  rectangle net 3V3: 3660,1331 3813,1450
  rectangle net 3V3: 3784,1331 3846,1535
  rectangle net BATT_IN: 3761,1633 3779,1795
  rectangle net GND: 3736,1533 3754,1795
  region net BATT_IN: 3831,1659.2 3769.64,1659.2 3769.64,1633 3831,1633
  rectangle net GND: 3684,1632 3746,1657
  rectangle net GND: 3537,1482 3595,1738
  rectangle net VBUS: 3603,1667 3726,1739
  rectangle net VBUS: 3602,1548 3671,1738
  rectangle net ISET: 3678,1548 3729,1624
  rectangle net CHG: 3783,1545 3846,1624
  rectangle net TS: 3791,1668 3911,1733
  rectangle net BATT_IN: 3853,1514 3912,1661
  rectangle net B_ADC: 3853,1354 3912,1507
  rectangle net GND: 3919,1437 3986,1733

## Silkscreen, mask and mechanical layers (free items; w line width, h text height)
Top Overlay:
  drawing of 13 lines, arcs and shapes, not listed
  text "#O_MIC" at 4588,2897 h50
  text "B_ADC" at 4588,2797.43 h50
  text "VOUT" at 4588,2697.86 h50
  text "RX" at 4588,2598.29 h50
  text "AC INPUT" at 3069,2523 h65 r270
  text "TX" at 4588,2498.71 h50
  text "3V3" at 4588,2399.14 h50
  text "GND" at 4588,2299.57 h50
  text "VBUS" at 4588,2200 h50
  text "STATUS LED" at 4554.35,2102 h50
  text "AC IN" at 3144,2032 h65
  text "AC OUTPUT" at 3069,1963 h65 r270
Bottom Overlay:
  drawing of 3094 lines, arcs and shapes, not listed
  text "ZERO CARBON FOOTPRINT" at 4986,1328 h38
Mechanical 13:
  lines w10: 3062.84,1523.28 3303,1523.28 3303,1291.32 5818.98,1291.32 5818.98,3811 5576,3811 5576,3561 4856,3561 4856,3811 4392,3811 3693,3811 3303,3811 3303,3579.03 3062.84,3579.03 3062.84,1523.28